# Altium PCB finalpcbmaybe.PcbDoc
Units mm, origin at the board's own origin, x right, y up, seen from the top; angles counter-clockwise.
Board outline 149 x 69.13 mm, 2 copper layers (Top Layer, Bottom Layer); 110 components, 42 nets, 234 pads, 45 vias.
Unrouted connection lines stored in the file: 1.
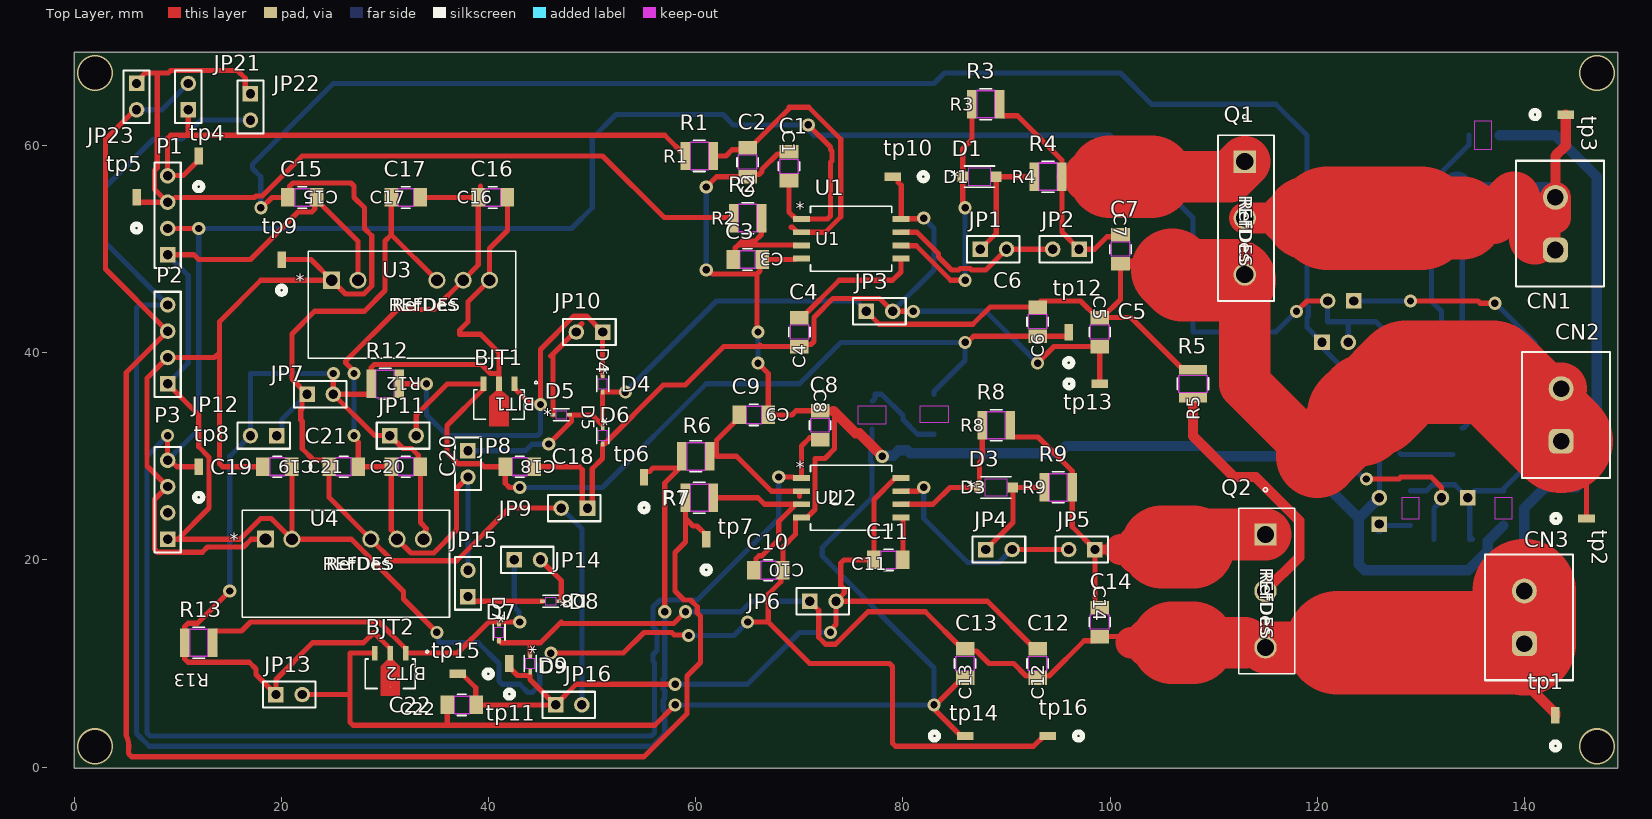
[diagram p0: Top Layer view]
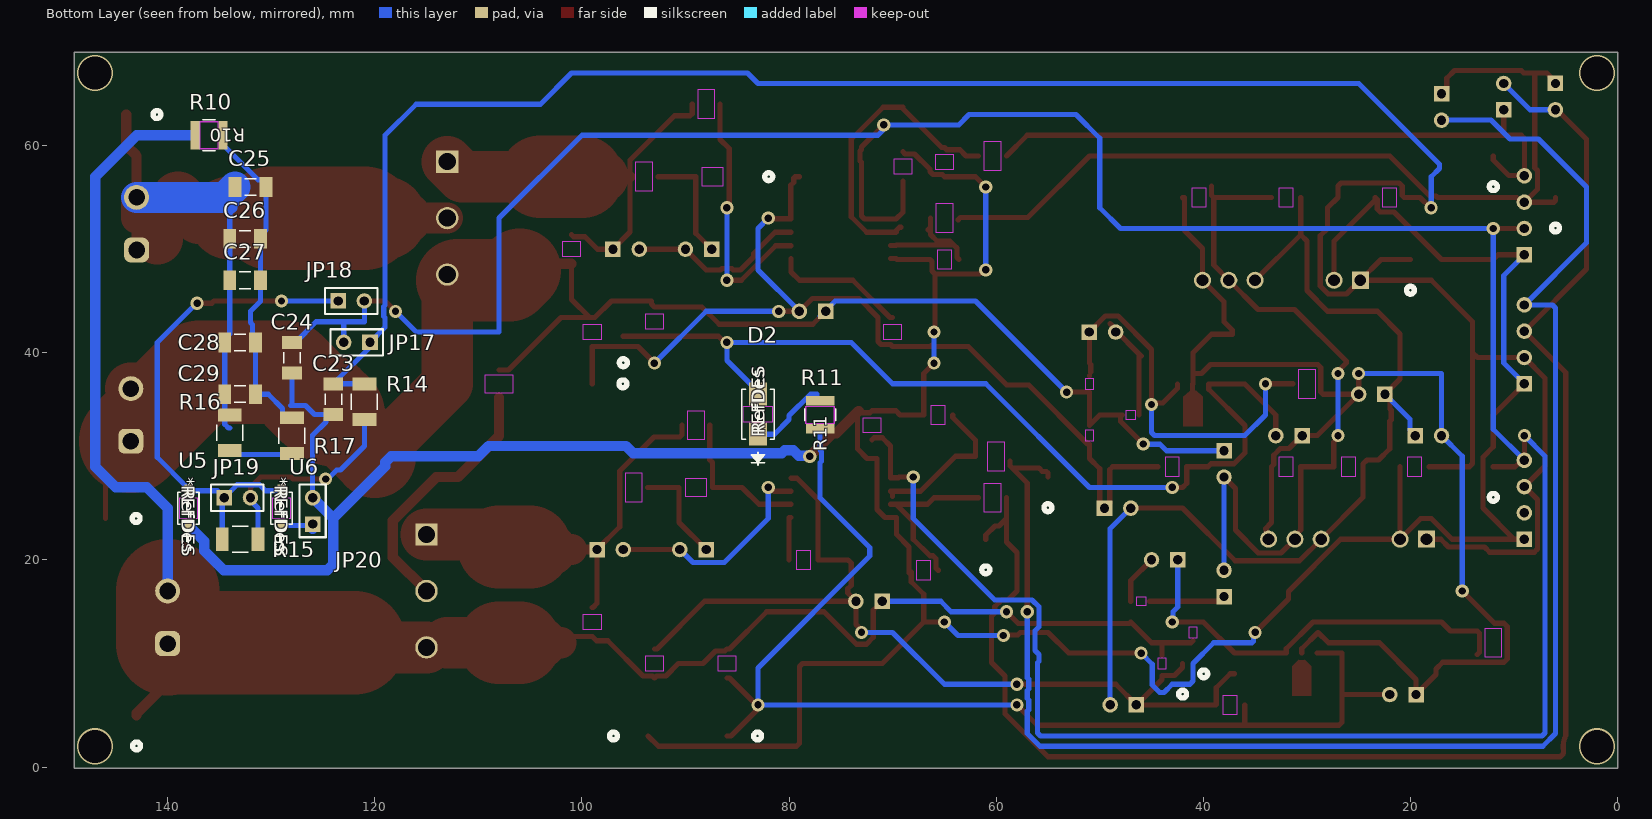
[diagram p1: Bottom Layer view, seen from below]
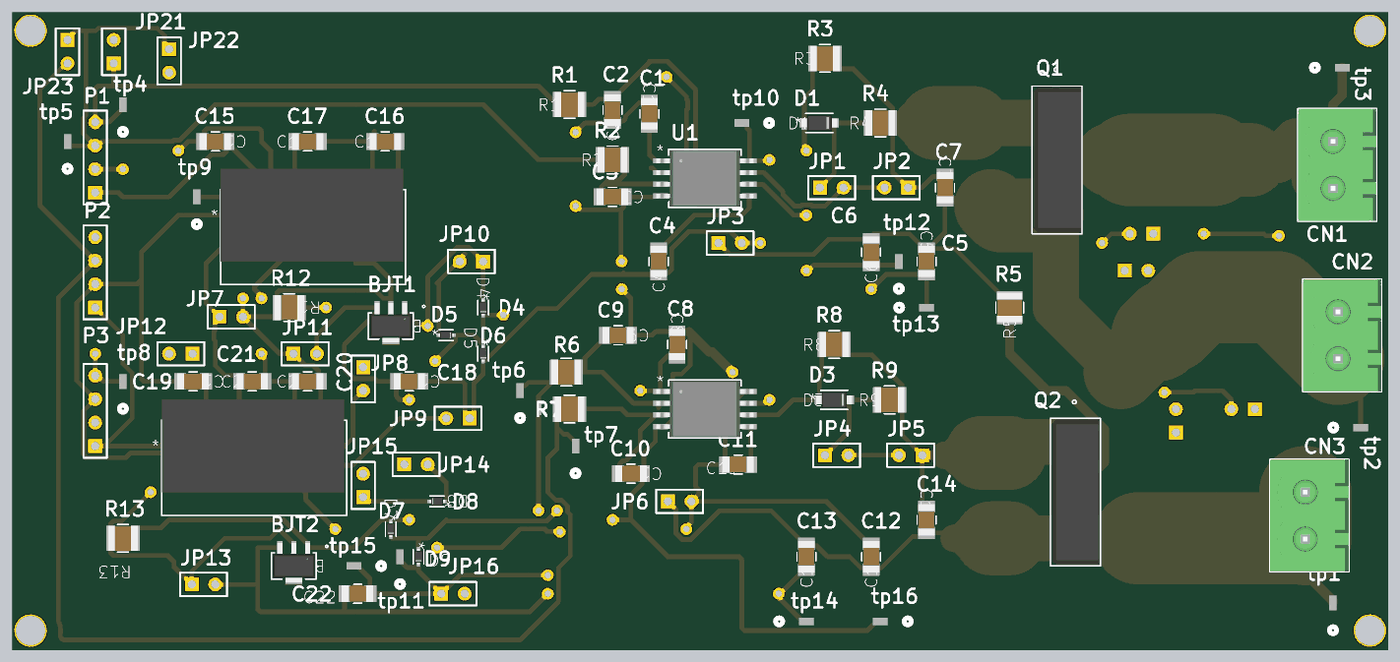
[diagram p2: 3D render of the assembled board from above, using the file's embedded part models]
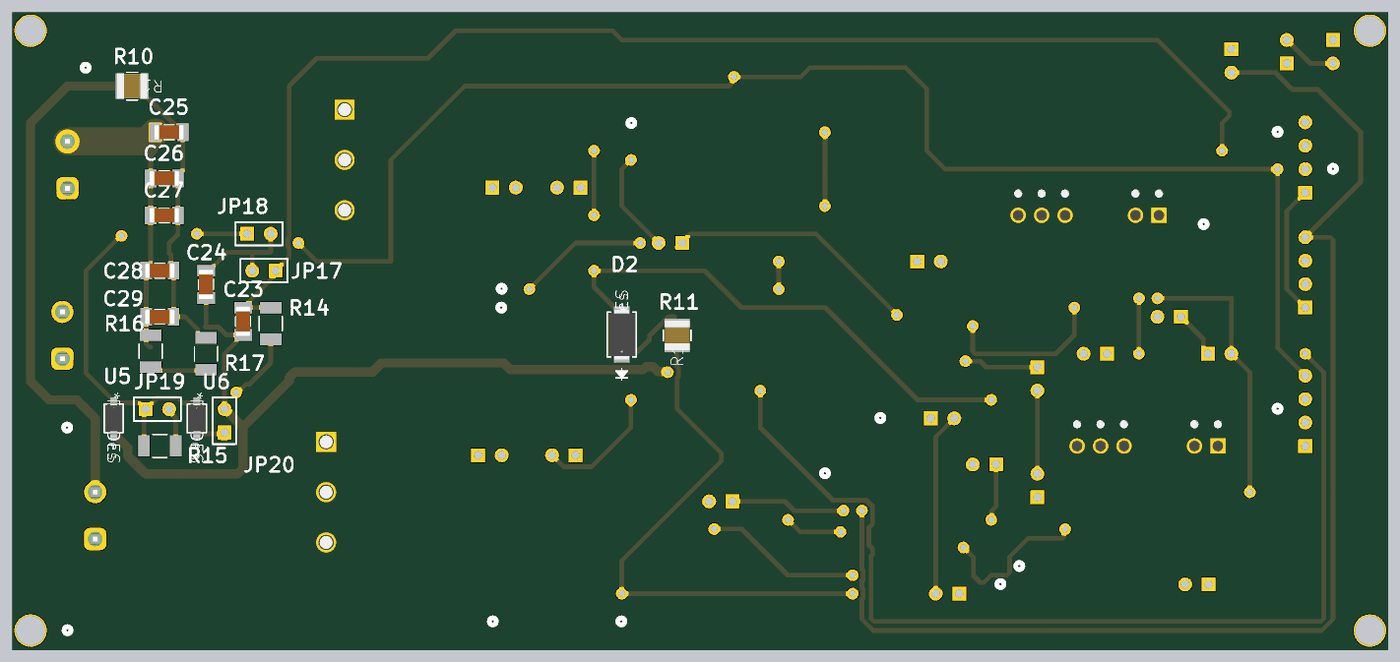
[diagram p3: 3D render of the assembled board from below, using the file's embedded part models]

## Layer stack, top to bottom
Top Solder: solder mask 0.0102, Solder Resist, Dk 3.5
Top Layer: signal copper 0.07
Dielectric 1: dielectric 0.32, FR-4, Dk 4.8
Bottom Layer: signal copper 0.07
Bottom Solder: solder mask 0.0102, Solder Resist, Dk 3.5

## Board outline
0,-0.127 149,-0.127 149,69 0,69

## Design rules (kind name [scope] priority, off if disabled: settings)
Clearance [All] p1: gap=0.254 ignorepadtopadclearanceinfootprint=FALSE
PolygonConnect [All] p1: connectstyle=Relief reliefconductorwidth=0.254 reliefentries=4 polygonreliefangle="90 Angle" airgapwidth=0.254
RoutingVias [All] p1: holewidth=0.711 width=1.27 viastyle="Through Hole" minholewidth=0.711 minwidth=1.27 maxholewidth=0.711 maxwidth=1.27
SolderMaskExpansion [All] p1: expansion=0.102 istentingtop=FALSE
SupplyNets "Schematic Supply Nets_1" [InNet('GND')] p1: voltage=0.000
Width [All] p1: maxlimit=10 minlimit=0.5 preferedwidth=10 bottomlayer_prefwidth=0.5 minimp=50.000000 maximp=50.000000 favimp=50.000000
30 further rules are at their usual default settings.

## Components (designator, comment, footprint, x,y, rotation, side; value= is the part's Value field where it differs from the comment)
BJT1 "2STF1360" SOT-89_STM 41,35 r180 top
BJT2 "2STF1360" SOT-89_STM 30.495,9.006 r180 top
C1 "100nF" CAPC340180_88N_KEM 69,58 r270 top
C2 "220pF" CAPC340180_88N_KEM 65,58.403 r90 top
C3 "220pF" CAPC340180_88N_KEM 65,49 r180 top
C4 "100nF" CAPC340180_88N_KEM 70,42 r90 top
C5 "1uF" CAPC340180_88N_KEM 99,42 r270 top
C6 "1uF" CAPC340180_88N_KEM 93,43 r90 top
C7 "N.M" CAPC340180_88N_KEM 101,50 r270 top
C8 "100nF" CAPC340180_88N_KEM 72,33 r270 top
C9 "220pF" CAPC340180_88N_KEM 65.597,34 r180 top
C10 "220pF" CAPC340180_88N_KEM 67,19 r180 top
C11 "100nF" CAPC340180_88N_KEM 78.597,20 r0 top
C12 "1uF" CAPC340180_88N_KEM 93,10 r90 top
C13 "1uF" CAPC340180_88N_KEM 86,10 r90 top
C14 "N.M" CAPC340180_88N_KEM 99,14 r270 top
C15 "NM" CAPC340180_88N_KEM 22,55 r180 top
C16 "1u" CAPC340180_88N_KEM 40.403,55 r0 top
C17 "1u" CAPC340180_88N_KEM 32,55 r0 top
C18 "4.7u" CAPC340180_88N_KEM 43,29 r180 top
C19 "NM" CAPC340180_88N_KEM 19.597,29 r180 top
C20 "1u" CAPC340180_88N_KEM 32,29 r0 top
C21 "1u" CAPC340180_88N_KEM 26,29 r0 top
C22 "4.7u" CAPC340180_88N_KEM 37.403,6 r180 top
C23 "10u" CAPC3216X178 124,35.515 r90 bottom
C24 "4.7U" CAPC3216X178 128,39.515 r90 bottom
C25 "NM" CAPC3216X178 132,56 r0 bottom
C26 "NM" CAPC3216X178 132.515,51 r0 bottom
C27 "NM" CAPC3216X178 132.515,47 r0 bottom
C28 "NM" CAPC3216X178 133,41 r0 bottom
C29 "33nF" CAPC3216X178 133,36 r0 bottom
CN1 "691311500102" 691311500102 143.45,52.46 r90 top
CN2 "691311500102" 691311500102 144,34 r90 top
CN3 "691311500102" 691311500102 140.45,14.46 r90 top
D1 "STPS2L40ZFY" CR_2L40ZFY_STM 87.389,57 r0 top
D2 "STTH112A" SMA_STM 83,34.07 r90 bottom
D3 "STPS2L40ZFY" CR_2L40ZFY_STM 89,27 r0 top
D4 "BZT585B2V7T-7" SOD523_DIO 51,37 r270 top
D5 "BZT585B2V7T-7" SOD523_DIO 47,34 r0 top
D6 "BZT585B2V7T-7" SOD523_DIO 51,32 r270 top
D7 "BZT585B2V7T-7" SOD523_DIO 41,13 r270 top
D8 "BZT585B2V7T-7" SOD523_DIO 46,16 r180 top
D9 "BZT585B2V7T-7" SOD523_DIO 44,10 r270 top
JP1 "Header 2" HDR1X2 87.46,50 r0 top
JP2 "Header 2" HDR1X2 97,50 r180 top
JP3 "Header 3" HDR1X2 76.46,44 r0 top
JP4 "Header 3" HDR1X2 88,21 r0 top
JP5 "Header 3" HDR1X2 98.54,21 r180 top
JP6 "Header 3" HDR1X2 71,16 r0 top
JP7 "Header 3" HDR1X2 22.46,36 r0 top
JP8 "Header 3" HDR1X2 38,30.54 r270 top
JP9 "Header 3" HDR1X2 49.54,25 r180 top
JP10 "Header 3" HDR1X2 51,42 r180 top
JP11 "Header 3" HDR1X2 30.46,32 r0 top
JP12 "Header 3" HDR1X2 19.54,32 r180 top
JP13 "Header 3" HDR1X2 19.46,7 r0 top
JP14 "Header 3" HDR1X2 42.46,20 r0 top
JP15 "Header 3" HDR1X2 38,16.46 r90 top
JP16 "Header 3" HDR1X2 46.46,6 r0 top
JP17 "Header 3" HDR1X2 120.46,41 r0 bottom
JP18 "Header 3" HDR1X2 123.54,45 r180 bottom
JP19 "Header 3" HDR1X2 134.54,26 r180 bottom
JP20 "Header 3" HDR1X2 126,23.46 r90 bottom
JP21 "Header 3" HDR1X2 11,63.46 r90 top
JP22 "Header 3" HDR1X2 17,65 r270 top
JP23 "Header 3" HDR1X2 6,66 r270 top
P1 "Header 4" HDR1X4 9,49.46 r90 top
P2 "Header 4" HDR1X4 9,37 r90 top
P3 "Header 4" HDR1X4 9,22 r90 top
Q1 "SCT040W120G3AG" QNMOS1G2D3S_HiP247_15p6x5p0-5p45_STM 113,58.45 r270 top
Q2 "SCT040W120G3AG" QNMOS1G2D3S_HiP247_15p6x5p0-5p45_STM 115,22.45 r270 top
R1 "100" RES_RC1210_3P1X2P6_YAG 60.346,59 r0 top
R2 "100" RES_RC1210_3P1X2P6_YAG 65,53 r0 top
R3 "39" RES_RC1210_3P1X2P6_YAG 88,64 r0 top
R4 "3.3" RES_RC1210_3P1X2P6_YAG 94,57 r0 top
R5 "NM" RES_RC1210_3P1X2P6_YAG 108,37 r90 top
R6 "100" RES_RC1210_3P1X2P6_YAG 60,30 r0 top
R7 "100" RES_RC1210_3P1X2P6_YAG 60.346,26 r0 top
R8 "39" RES_RC1210_3P1X2P6_YAG 89,33 r0 top
R9 "3.3" RES_RC1210_3P1X2P6_YAG 95,27 r0 top
R10 "NM" RES_RC1210_3P1X2P6_YAG 136,61 r0 bottom
R11 "10-20R" RES_RC1210_3P1X2P6_YAG 77,34 r90 bottom
R12 "1k" RES_RC1210_3P1X2P6_YAG 30,37 r180 top
R13 "1k" RES_RC1210_3P1X2P6_YAG 12,12 r180 top
R14 "240" RES_ERJ14BQF2R2U 121,35.275 r90 bottom
R15 "100" RES_ERJ14BQF2R2U 133,22 r180 bottom
R16 "NM" RES_ERJ14BQF2R2U 134,32.275 r90 bottom
R17 "NM" RES_ERJ14BQF2R2U 128,32 r270 bottom
tp1 "RCU-0C" CONN1_RCU-0C_TEC 143,5 r90 top
tp2 "RCU-0C" CONN1_RCU-0C_TEC 146,24 r0 top
tp3 "RCU-0C" CONN1_RCU-0C_TEC 144,63 r0 top
tp4 "RCU-0C" CONN1_RCU-0C_TEC 12,59 r90 top
tp5 "RCU-0C" CONN1_RCU-0C_TEC 6,55 r90 top
tp6 "RCU-0C" CONN1_RCU-0C_TEC 55,28 r90 top
tp7 "RCU-0C" CONN1_RCU-0C_TEC 61,22 r90 top
tp8 "RCU-0C" CONN1_RCU-0C_TEC 12,29 r90 top
tp9 "RCU-0C" CONN1_RCU-0C_TEC 20,49 r90 top
tp10 "RCU-0C" CONN1_RCU-0C_TEC 79,57 r180 top
tp11 "RCU-0C" CONN1_RCU-0C_TEC 42,10 r90 top
tp12 "RCU-0C" CONN1_RCU-0C_TEC 96,42 r90 top
tp13 "RCU-0C" CONN1_RCU-0C_TEC 99,37 r0 top
tp14 "RCU-0C" CONN1_RCU-0C_TEC 86,3 r0 top
tp15 "RCU-0C" CONN1_RCU-0C_TEC 37,9 r180 top
tp16 "RCU-0C" CONN1_RCU-0C_TEC 94,3 r180 top
U1 "STGAP2SICSCTR" SO8_7P59X6P05_STM 75,51 r0 top
U2 "STGAP2SICSCTR" SO8_7P59X6P05_STM 75,26 r0 top
U3 "MGJ2D051505SC" MGJ2_MUR 24.84,47 r0 top
U4 "MGJ2D051505SC" MGJ2_MUR 18.46,22 r0 top
U5 "MMSZ5V1T1G" SOD-123_ONS 138,25 r270 bottom
U6 "MMSZ3V3T1G" SOD-123_ONS 129,25 r270 bottom

## Footprints (in the part's own frame and the unit in brackets; to place one, negate y for a bottom-side part, rotate by r counter-clockwise, add the part's x,y. Pads: shape width x height; smd on the part's side, far side on the other; paste and mask are expansions set on the pad)
691311500102 [mm] "5,08mm - PCB Headers - Vertical - Closed ends -02p"
  rrect50% 2.4x2.4 hole 1.6: 1(-2.54,0.45)
  round 2.4 hole 1.6: 2(2.54,0.45)
  silkscreen extent -6.08,-4.25 6.08,4.25, body extent -6.08,-4.25 6.08,4.25, height 12.05
CAPC3216X178 [mm]
  rect 1.24x1.91 smd: 1(-1.485,0) 2(1.485,0)
  silkscreen extent -0.55,-0.8 0.55,0.8, body extent -1.6,-0.8 1.6,0.8, height 1.8
CAPC340180_88N_KEM [mm]
  rect 1.306x1.8 smd paste+0 mask+0: 1(-1.403,0) 2(1.403,0)
  Top Layer keep-out region: -0.699,-0.849 -0.699,0.849 0.699,0.849 0.699,-0.849
  Keep-Out Layer region: -0.699,-0.9 -0.699,0.9 0.699,0.9 0.699,-0.9
  silkscreen extent -0.44,-1.03 0.44,1.03, body extent -1.7,-0.9 1.7,0.9, height 0.88
CONN1_RCU-0C_TEC [mil]
  rect 63x32 smd paste+0 mask+0: 1(0,0)
  silkscreen extent -131,-15 -102,15
CR_2L40ZFY_STM [mil]
  rect 40.87x39 smd paste+0 mask+0: 1(-63.44,0) 2(63.44,0)
  Top Layer keep-out region: -41,-33.5 -41,33.5 41,33.5 41,-33.5
  Keep-Out Layer region: -41,-33.5 -41,33.5 41,33.5 41,-33.5
  silkscreen extent -58,-40 58,40, body extent -76,-36 76,36, height 43
HDR1X2 [mm] "Connector; Header; 2 Position"
  rect 1.5x1.5 hole 0.9: 1(0,0)
  round 1.5 hole 0.9: 2(2.54,0)
  silkscreen extent -1.27,-1.27 3.81,1.27
HDR1X4 [mm] "Connector; Header; 4 Position"
  rect 1.5x1.5 hole 0.9: 1(0,0)
  round 1.5 hole 0.9: 2(2.54,0) 3(5.08,0) 4(7.62,0)
  silkscreen extent -1.27,-1.27 8.89,1.27
MGJ2_MUR [mil]
  rect 65x65 / inner round 60 / far side rect 65x65 hole 45 paste-99999 mask+0: 1(0,0)
  round 65 / inner round 60 / far side round 65 hole 45 paste-99999 mask+0: 2(100,0) 5(400,0) 6(500,0) 7(600,0)
  silkscreen extent -89,-296 699,110, body extent -89,-198 689,198, height 502
QNMOS1G2D3S_HiP247_15p6x5p0-5p45_STM [mil]
  rect 85x85 / inner round 60 / far side rect 85x85 hole 65 paste-99999 mask+0: 1(0,0)
  round 85 / inner round 60 / far side round 85 hole 65 paste-99999 mask+0: 2(214.57,0) 3(429.13,0)
  silkscreen extent -178,-102 530,111, body extent -95,-97 525,106, height 963
RES_ERJ14BQF2R2U [mm]
  rect 1.25x2.3 smd: 1(-1.725,0) 2(1.725,0)
  silkscreen extent -0.78,-1.25 0.78,1.25
RES_RC1210_3P1X2P6_YAG [mil]
  rect 36x108 smd paste+0 mask+0: 1(-53,0) 2(53,0)
  Top Layer keep-out region: -33,-52 -33,52 33,52 33,-52
  Keep-Out Layer region: -33,-54 -33,54 33,54 33,-54
  silkscreen extent -23,-59 23,59, body extent -63,-54 63,54, height 26
SMA_STM [mil]
  rect 87x67 smd paste+0 mask+0: 1(-76,0) 2(76,0)
  Top Layer keep-out region: -30.5,-55 -30.5,55 30.5,55 30.5,-55
  Keep-Out Layer region: -30.5,-55 -30.5,55 30.5,55 30.5,-55
  silkscreen extent -194,-62 96,62, body extent -106,-57 106,57, height 104
SO8_7P59X6P05_STM [mil]
  rect 64x22 smd paste+0 mask+0: 1(-189,75) 2(-189,25) 3(-189,-25) 4(-189,-75) 5(189,-75) 6(189,-25) 7(189,25) 8(189,75)
  silkscreen extent -154,-124 154,124, body extent -207,-119 207,119, height 104
SOD523_DIO [mm]
  rect 0.503x0.35 smd paste+0 mask+0: 1(-0.802,0) 2(0.802,0)
  Top Layer keep-out region: -0.499,-0.399 -0.499,0.399 0.499,0.399 0.499,-0.399
  Keep-Out Layer region: -0.499,-0.399 -0.499,0.399 0.499,0.399 0.499,-0.399
  silkscreen extent -0.78,-0.58 0.78,0.58, body extent -0.85,-0.45 0.85,0.45, height 0.82
SOD-123_ONS [mil]
  rect 48x30 smd paste+0 mask+0: 1(-66,0) 2(66,0)
  Keep-Out Layer region: -40,-33.5 -40,33.5 40,33.5 40,-33.5
  silkscreen extent -61,-41 61,41, body extent -76,-36 76,36, height 53
SOT-89_STM [mil]
  rect 22x55 smd paste+0 mask+0: 1(-58.86,-78.5) 2(0,-78.5) 3(58.86,-78.5)
  rect 2x2 smd paste-1 mask-1: 4(0,50)
  Top Layer region: 11,-51 -11,-51 -11,-53 -37,-29 -37,83 37,83 37,-29 11,-54
  silkscreen extent -146,-88 96,56, body extent -91,-98 91,69, height 65

## Part data
BJT1 BJT2: "Low voltage fast-switching NPN power transistor", Manufacturer_Name=STMicroelectronics, Copyright="Copyright (C) 2025 Ultra Librarian. All rights reserved.", Manufacturer_Part_Number=2STF1360, RefDes=RefDes, Type=Type
C1 C2 C3 C4 C5 C6 C7 C8 C9 C10 C11 C12 C13 C14 C15 C16 C17 C18 C19 C20 C21 C22: library part C1206C100J5GACTU, "SMD Comm C0G, Ceramic, 10 pF, 5%, 50 VDC, C0G, SMD, MLCC, Ultra-Stable, Low Loss, Class I, 1206", Manufacturer_Name=Kemet, Copyright="Copyright (C) 2025 Ultra Librarian. All rights reserved.", Manufacturer_Part_Number=C1206C100J5GACTU
C23 C24 C25 C26 C27 C28 C29: library part 12063C105KAT2A, "1 ÂµF Â±10% 25V Ceramic Capacitor X7R 1206 (3216 Metric)", Package="1206-2 KEMET", Check_prices=https://www.snapeda.com/parts/12063C105KAT2A/Kyocera/view-part/?ref=eda, MF="KYOCERA AVX Components Corporation", MP=12063C105KAT2A, SnapEDA_Link=https://www.snapeda.com/parts/12063C105KAT2A/Kyocera/view-part/?ref=snap
CN1 CN2 CN3: "WR-TBL Series 311 Close Vertical PCB Header, THT, pitch 5.08mm, 02p", Manufacturer="Wurth Elektronik", Max Operating Temperature=105°C, Min Operating Temperature=-40°C, Rated Current=20A, Working Voltage=300V, Application=Pluggable, Category="Terminal Block", ComponentLink1Description="Website Link", ComponentLink1URL=https://www.we-online.com/redexpert/article/691311500102?ad, ComponentLink2Description="Datasheet Link", ComponentLink2URL=https://www.we-online.com/redexpert/spec/691311500102?ad, Manufacturer Part Number=691311500102, Match Code=WR-TBL, Modularity=No, Mount="Through Hole", Number of Pins=2, Number of Rows=1, Orientation=Vertical, Packaging=Box, Pitch=5.08mm, System="Pluggable Connector"
D1 D3: "Automotive 40 V, 2 A Low Drop Power Schottky Rectifier", Manufacturer_Name=STMicroelectronics, Copyright="Copyright (C) 2026 Ultra Librarian. All rights reserved.", Manufacturer_Part_Number=STPS2L40ZFY
D2: "1200 V, 1A Ultrafast Diode", Manufacturer_Name=STMicroelectronics, Copyright="Copyright (C) 2025 Ultra Librarian. All rights reserved.", Manufacturer_Part_Number=STTH112A
D4 D5 D6 D7 D8 D9: "Description", Manufacturer_Name="Diodes Inc", Copyright="Copyright (C) 2025 Ultra Librarian. All rights reserved.", Manufacturer_Part_Number=BZT585B2V7T-7
JP1 JP2: "Header, 2-Pin", LatestRevisionDate=17-Jul-2002, LatestRevisionNote="Re-released for DXP Platform.", Publisher="Altium Limited"
JP3 JP4 JP5 JP6 JP7 JP8 JP9 JP10 JP11 JP12 JP13 JP14 JP15 JP16 JP17 JP18 JP19 JP20 JP21 JP22 JP23: library part "Header 2", "Header, 2-Pin", LatestRevisionDate=17-Jul-2002, LatestRevisionNote="Re-released for DXP Platform.", Publisher="Altium Limited"
P1 P2 P3: "Header, 4-Pin", LatestRevisionDate=17-Jul-2002, LatestRevisionNote="Re-released for DXP Platform.", Publisher="Altium Limited"
Q1 Q2: "Automotive-grade silicon carbide Power MOSFET 1200 V, 40 mOhm typ., 40 A in an HiP247 package", Manufacturer_Name=STMicroelectronics, Copyright="Copyright (C) 2025 Ultra Librarian. All rights reserved.", Manufacturer_Part_Number=SCT040W120G3AG, Type=Transistors
R1 R2 R3 R4 R5 R6 R7 R8 R9 R10 R11 R12 R13: library part RC1210FR-071RL, "No Description Available", Manufacturer_Name=Yageo, Copyright="Copyright (C) 2026 Ultra Librarian. All rights reserved.", Manufacturer_Part_Number=RC1210FR-071RL
R14 R15 R16 R17: library part ERJ14BQF2R2U, Package=None, Availability=Unavailable, MP=ERJ14BQF2R2U, Price=None
tp1 tp2 tp3 tp4 tp5 tp6 tp7 tp8 tp9 tp10 tp11 tp12 tp13 tp14 tp15 tp16: "0603 PROBE PAD", Manufacturer_Name="TE Connectivity", Copyright="Copyright (C) 2025 Ultra Librarian. All rights reserved.", Manufacturer_Part_Number=RCU-0C, RefDes=RefDes, Type=Type
U1 U2: "Galvanically isolated 4 A single gate driver for SiC MOSFETs", Manufacturer_Name=STMicroelectronics, Copyright="Copyright (C) 2026 Ultra Librarian. All rights reserved.", Manufacturer_Part_Number=STGAP2SICSCTR, RefDes=RefDes, Type=Type
U3 U4: "Description", Manufacturer_Name=Murata, Copyright="Copyright (C) 2025 Ultra Librarian. All rights reserved.", Manufacturer_Part_Number=MGJ2D051505SC, RefDes=RefDes, Type=Type
U5 U6: "Description", Manufacturer_Name=onsemi, Copyright="Copyright (C) 2025 Ultra Librarian. All rights reserved.", RefDes=RefDes, Type=Type
  U5: Manufacturer_Part_Number=MMSZ5V1T1G
  U6: Manufacturer_Part_Number=MMSZ3V3T1G

## Via types
v1: diameter 1.27, hole 0.711, Top Layer to Bottom Layer, 41 vias
v2: diameter 3.5, hole 3.2, Top Layer to Bottom Layer, 4 vias

## Nets (pads, with @x,y where several pads share a name; then routed paths per layer and width w, separated by ;. In a path a pad name is that pad's centre, name@x,y a point inside that pad or via, vN(x,y) a via of type N, cw(c..) or ccw(c..) an arc to the next point about the centre after c; other vN are vias at no path point)
0V: C16.1 C17.2 C20.1 C21.2 JP8.2 JP15.2 U3.6 U4.6 | length 72.9
  Top Layer w0.5: v1(27,32) 27,31.792 27.403,31.389 C21.2 C20.1 30.597,22.874 31.16,22.311 U4.6 32.49,20.671 34.688,20.671 36.904,22.887 36.904,26.904 JP8.2 ; v1(27,38) 27,38.208 26.207,39.001 26.207,39.207 31.182,44.182 34.722,44.182 U3.6 39,48.46 C16.1 ; C17.2 C16.1 ; 39.2,56.109 39.2,55.2 C16.1
  Bottom Layer w0.5: v1(27,32) v1(27,38) ; JP15.2 JP8.2
+VOUT: BJT1.2 BJT2.2 C16.2 C20.2 JP7.2 JP11.1 JP12.2 JP13.1 R12.2 R13.2 U3.7 U4.7 | length 128.5
  Top Layer w0.5: v1(15,17) 11.876,13.876 10.953,13.876 10.658,13.58 10.658,12.004 R13.2 10.658,11.996 10.658,10.42 10.953,10.124 16.876,10.124 17.523,9.477 17.523,8.937 JP13.1 19.46,8.46 23,12 27.914,12 28.914,13 30.495,11.419 BJT2.2 ; v1(25,38) JP7.2 ; R12.2@28.654,37.793 R12.2 28.654,36.207 28.447,36 JP7.2 ; R12.2@28.658,38 28.658,38.58 28.953,38.876 39.314,38.876 40.19,38 41,38 ; U4.7 33.92,22.22 33.92,22.92 34,23 33.403,23.597 C20.2 33.203,29.2 33.203,30.109 32.566,30.746 31.714,30.746 JP11.1 29,32 JP7.2 ; 41.125,36.171 41.029,36.266 41.029,36.965 BJT1.2 41,38 ; C16.2 42,55 41.806,54.806 41.806,51.793 40.08,50.068 U3.7 38,44.92 38,43 37.207,42.207 37.207,41.793 39.207,41.793 41,40 41,38
  Bottom Layer w0.5: v1(15,17) 15,30 JP12.2 17,38 v1(25,38)
-VOUT: C17.1 C21.1 JP7.1 JP9.2 JP12.1 JP16.2 U3.5 U4.5 | length 96.7
  Top Layer w0.5: JP7.1@22,36 21.96,35.96 21.96,34.571 21.861,34.472 21.861,33.528 22,33.389 22,30.73 23.08,29.65 24.194,29.65 24.597,29.247 C21.1 24.597,26.023 U4.5 30.703,19.917 36.917,19.917 42,25 JP9.2 ; JP7.1 21,37.46 21,41.806 23.194,44 28,44 30,46 30,50.806 30.597,51.403 ; C17.1 30.597,51.403 ; U3.5 30.597,51.403
  Bottom Layer w0.5: JP12.1 JP12.1@20,32 ; JP12.1@19.77,32.23 20.04,32.5 20.04,33.58 JP7.1 ; JP9.2 49,23 JP16.2
"C_IN +H": JP21.1 P1.4 R1.1 tp4.1 | length 60.8
  Top Layer w0.5: P1.4 9.026,57.106 10.5,57.106 12,58.606 tp4.1 ; P1.4@9,57.349 9,60.707 9.293,61 11,61 ; JP21.1 11,61 ; R1.1 57,61 11,61
"C_IN +L": JP22.2 P2.4 R6.1 tp6.1 | length 158.1
  Top Layer w0.5: tp6.1 55,28.394 55.156,28.55 55.55,28.55 55.878,28.878 R6.1@58.447,28.878 ; v1(57,15) 57,27.432 R6.1@58.447,28.878 ; R6.1@58.654,29.543 58.654,29.086 R6.1@58.447,28.878
  Bottom Layer w0.5: JP22.2 12.213,62.46 10.387,60.634 7.634,60.634 3,56 3,50.62 P2.4 6.293,44.62 6,44.327 6,3.227 7.227,2 55.773,2 57,3.227 57,5.389 56.861,5.528 56.861,6.472 57,6.611 57,7.389 56.861,7.528 56.861,8.472 57,8.611 v1(57,15)
"C_IN -H": JP22.1 JP23.1 P1.3 R2.1 tp5.1 | length 87.8
  Top Layer w0.5: tp5.1 6,54.696 6.156,54.54 P1.3 ; JP23.1@6.381,66.54 6.841,67 8,67 ; 9,67 8,67 ; 9.093,67.04 9.307,67.254 15.746,67.254 16.5,66.5 16.5,65.5 JP22.1 ; R2.1@63.658,52.834 63.447,53.046 56.954,53.046 51,59 22,59 18.139,55.139 17.528,55.139 17.389,55 9.731,55 9.271,54.54 P1.3 ; 8,67 8,57.853 7.746,57.599 7.746,55.794 P1.3
"C_IN -L": JP21.2 JP23.2 P2.3 R7.1 tp7.1 | length 155.7
  Top Layer w0.5: JP23.2 5.841,63.46 3,60.619 3,48.08 P2.3 5,38.08 5,3.039 cw(c3,2) 5.216,1.589 ccw(c5.708,1.5) 5.416,1.094 5.547,1 5.708,1 55,1 59.139,5.139 59.139,8.793 60.444,10.098 60.444,14.556 60.139,14.861 60.139,15.472 59.472,16.139 58.861,16.139 58,17 58,20.716 59,21.716 59,24 ; R7.1 59,24 ; tp7.1 61,22.394 60.119,23.275 59.725,23.275 59,24
  Bottom Layer w0.5: JP23.2 8.46,63.46 JP21.2
GND: C1.1 C2.1 C3.1 C8.1 C9.1 C10.1 C15.1 C19.1 C23.1 C24.1 JP20.2 P1.1 P2.1 P3.1 tp16.1 U1.4 U2.4 U3.2 U4.2 U5.2 | length 343.1
  Top Layer w0.5: P3.1 10,22 ; P2.1 12,34 12,30.919 13,29.919 13,25 10,22 ; P1.1 11.54,49.46 12,49 17,49 21.596,53.596 22.908,53.596 23.203,53.891 C15.1@23.203,54.8 ; C19.1 U4.2 ; C15.1 23.403,54.753 27.38,50.776 U3.2 ; v1(35,13) 31.78,16.22 31.78,16.96 26.74,22 U4.2 ; v1(46,11) 53,11 55,13 57.67,13 57.92,12.75 59.25,12.75 v1(59.305,12.695) ; v1(61,48) 61.208,48 61.612,47.596 65.908,47.596 ; v1(61,56) 62,57 C2.1 65.2,57.2 66.109,57.2 66.404,57.495 66.404,57.716 67.891,59.203 68.8,59.203 C1.1 ; v1(65,14) 67,14 ; v1(66,39) 67,38 C9.1 69.275,34 69.678,34.403 C8.1 72.2,34.203 73.109,34.203 ; v1(66,42) 65.908,42.092 65.908,47.596 ; C10.1@68.403,18.753 68.403,21.241 69.637,22.475 69.637,24.066 69.666,24.095 U2.4 70.733,24.095 71.219,24.582 71.221,24.582 71.516,24.877 71.516,29.796 72.464,29.796 73.404,30.736 73.404,33.908 ; C10.1 68.203,18.8 68.203,17.891 67,16.688 67,14 ; U1.4 69.666,49.095 69.571,49 C3.1 66.203,48.8 66.203,47.891 65.908,47.596 ; tp16.1@93.606,3 92.606,2 79.289,2 78.996,2.293 78.996,9.707 78.703,10 71,10 67,14 ; 10,22 16,22 18,24 19,24 U4.2
  Top Layer w1: 73.286,34.38 75.45,32.216 75.784,32.216 v1(78,30)
  Bottom Layer w0.5: P2.1 11,39 11,47.46 P1.1 ; v1(35,13) 35.147,12.853 35.147,12.146 35.293,12 39,12 41,10 41,8.293 41.293,8 43,8 43.793,7.207 44.207,7.207 44.926,7.926 44.926,9.926 v1(46,11) ; v1(59.305,12.695) 63.695,12.695 v1(65,14) ; v1(61,48) v1(61,56) ; v1(66,39) v1(66,42) ; C23.1 C23.1@124.335,34.03 ; JP20.2 126,32.03 124.705,33.325 124.705,33.66 C23.1@124.335,34.03 ; C24.1 128,35 128.104,34.896 126.683,34.896 125.817,34.03 C23.1@124.335,34.03
  Bottom Layer w1: v1(78,30) 78.052,30.052 79.052,30.052 79.586,30.586 80.414,30.586 80.72,30.28 95.059,30.28 95.778,31 109,31 110,30 118.414,30 119,29.414 119,29.026 124,24.026 ; JP20.2 125.974,26 124,24.026 ; U5.2@137.991,23.324 136.467,21.8 136.467,20.9 134.566,19 124.586,19 124,19.586 124,24.026
GNDISO_H: C4.1 C5.2 C18.1 D6.2 JP3.2 JP9.1 tp10.1 tp13.1 U1.8 | length 95.6
  Top Layer w0.5: C18.1 48.747,29 49.04,28.707 49.04,25.5 JP9.1 50,25.46 50,28.802 51,29.802 D6.2 51.186,31.198 56.863,36.876 58.974,36.876 62.695,40.597 66.348,40.597 ; 66.191,40.753 66.348,40.597 ; tp10.1 79.394,57 79.55,56.844 79.55,56.45 79.83,56.17 79.83,52.934 81.934,52.934 v1(82,53) ; v1(81,44) JP3.2 77.746,45.254 73.254,45.254 71.404,43.404 71.404,41.092 71.109,40.797 70.2,40.797 C4.1 66.348,40.597 ; v1(93,39) 94.597,40.597 C5.2 tp13.1
  Bottom Layer w0.5: JP3.2 83,48 83,52 v1(82,53) ; v1(81,44) 88,44 v1(93,39)
GNDISO_L: C11.1 C12.2 C22.1 D9.2 JP6.2 JP16.1 tp11.1 tp15.1 U2.8 | length 89
  Top Layer w0.5: tp15.1 37.394,9 38.744,7.65 38.744,6.062 C22.1 JP16.1 ; tp11.1 42,9.606 42.777,8.829 44,8.829 44,8.46 JP16.1 ; v1(58,8) 48.46,8 JP16.1 ; v1(73,13) 73,13.208 73.54,13.748 JP6.2 ; U2.8 79.771,27.876 79.236,27.876 77.194,25.834 C11.1 74.293,20 74,19.707 74,17.54 74.333,17.207 74.333,16.793 JP6.2 ; C12.2 92.753,11.403 88.156,16 JP6.2
  Bottom Layer w0.5: v1(58,8) 65,8 70,13 v1(73,13)
HS_SK: C5.1 C6.2 C7.2 CN2.1 CN2.2 D4.2 D5.2 D6.1 JP3.1 JP8.1 Q1.3 R5.2 tp2.1 | length 163.9
  Top Layer w0.5: v1(45.805,31.195) 48.003,33.392 D5.2@48.003,34 ; D5.2 D5.2@48.003,34 ; D4.2@51,35.997 51,33.003 50.003,34 D5.2@48.003,34 ; D4.2 v1(53.198,36.198) ; JP3.1 77.714,42.746 86.746,42.746 88.403,44.403 C6.2 93.293,44.696 93.293,45 97.156,45 98.753,43.403 C5.1 C5.1@99.247,43.403 ; C7.2 101,45.156 C5.1@99.247,43.403 ; R5.2 107.086,38.346 102.029,43.403 C5.1@99.247,43.403 ; CN2.1 146,29.01 tp2.1
  Top Layer w1: C7.2 103.403,48.597 104,48
  Top Layer w3: 104,48 105,48
  Top Layer w5: 105,48 106,48 ; Q1.3 113,37 120,30 ; 141,35 142.54,36.54 CN2.2
  Top Layer w8: 106,48 107,47 112,47 ; 120,30 124,34
  Top Layer w10: 124,34 124.996,34.996 125.487,34.996 128.608,38.117 136.893,38.117 CN2.1
  Bottom Layer w0.5: JP8.1 43.54,30.54 44.17,31.17 v1@45.781,31.17 ; v1(53.198,36.198) 62,45 75.54,45 JP3.1@77,43.54
HV: C25.2 C26.2 C27.2 C28.2 C29.2 CN1.1 CN1.2 Q1.2 R16.2 tp3.1 | length 72.7
  Top Layer w1: CN1.2 143,59 144,60 tp3.1
  Top Layer w3: Q1.2 117,53 ; 143,53 CN1.2
  Top Layer w5: 117,53 119,53 ; 134,53 137,53 139,55 ; 141,51 141,53
  Top Layer w8: 119,53 121,53 ; 130,53 134,53
  Top Layer w10: 121,53 130,53
  Bottom Layer w0.5: C25.2 133.485,53.943 134,53.428 C26.2 C27.2@134,47.032 ; 134,32.725 134.11,32.725 134.485,33.1 C29.2 C28.2 ; C27.2 134,41.82 C28.2@134.453,41.367
  Bottom Layer w3: C25.2 134.485,55 CN1.2
LS_SK: C12.1 C13.2 C14.2 CN3.1 CN3.2 D7.2 D8.2 D9.1 JP6.1 JP15.1 Q2.3 R10.2 tp1.1 | length 185.7
  Top Layer w0.5: JP15.1 38.46,16 D8.2 ; D7.2 41.198,12 44,12 ; D9.1 44,12 ; v1(59,15) 57.861,13.861 47.139,13.861 47,14 45,12 44,12 ; JP6.1 71.861,15.139 71.861,12.528 72.528,11.861 73.472,11.861 76.611,15 82.156,15 85.753,11.403 C13.2 86.2,11.203 87.109,11.203 88.312,10 90.688,10 91.891,8.797 92.8,8.797 C12.1 93.2,8.797 94.109,8.797 97.506,12.194 98.597,12.194 C14.2 101.403,12.597 102,12
  Top Layer w1: CN3.1 140,8.207 143,5.206 tp1.1
  Top Layer w3: 102,12 104,12
  Top Layer w5: 104,12 106,12 ; 108,12 113,12 ; Q2.3 121.55,11.55 122,12
  Top Layer w8: 106,12 108,12
  Top Layer w10: 122,12 139.92,12 CN3.1 CN3.2
  Bottom Layer w0.5: v1(59,15) 64.354,15 65.354,16 JP6.1
  Bottom Layer w1: R10.2@137.592,61 143,61 147,57 147,29 145,27 142,27 140,25 CN3.2
NetBJT1_1: BJT1.1 D4.1 JP10.1 R12.1 | length 41.2
  Top Layer w0.5: R12.1 v1(34,37) ; BJT1.1 42.495,36.575 43.922,35.147 44.853,35.147 v1(45,35) 45,40.313 48.251,43.565 49.435,43.565 JP10.1 51,39 50.861,38.861 50.861,38.143 ; D4.1@50.984,37.742 50.984,37.785 D4.1
  Bottom Layer w0.5: v1(34,37) 34,34 36,32 44.707,32 45,32.293 v1(45,35)
NetBJT2_1: BJT2.1 D7.1 JP14.1 R13.1 | length 41.2
  Top Layer w0.5: R13.1@13.553,10.878 13.346,11.086 R13.1 13.346,12.914 13.553,13.122 16.122,13.122 17,14 29.409,14 31.99,11.419 BJT2.1 37,11 40,14 40.5,14 40.503,14.003 41.608,14.003 41.611,14 v1(43,14)
  Bottom Layer w0.5: JP14.1 42.46,15.46 42.92,15 42.92,14.08 v1(43,14)
NetC2_2: C2.2 R1.2 U1.2 | length 28.8
  Top Layer w0.5: R1.2 62.9,59 63.506,59.606 64.8,59.606 C2.2 65.247,59.806 69,63.558 69,63.707 70.904,63.707 74,60.611 74,53.132 72.503,51.635 69.666,51.635 69.637,51.664 69.637,51.829 69.344,52.122 69.178,52.122
NetC3_2: C3.2 R2.2 U1.3 | length 12.3
  Top Layer w0.5: C3.2 63.797,49.2 63.797,50.109 64.092,50.404 ; R2.2 66.346,52.086 66.553,51.878 66.342,51.878 66.342,51.42 65.687,50.764 64.452,50.764 64.092,50.404 ; U1.3 69.666,50.365 69.627,50.404 64.092,50.404
NetC4_2: C4.2 U1.5 | length 12.9
  Top Layer w0.5: C4.2 70.247,43.403 73.844,47 79,47 79.801,47.801 U1.5
NetC7_1: C7.1 JP2.1 Q1.1 R3.2 R4.2 | length 40.9
  Top Layer w0.5: R3.2 89.346,63.086 89.553,62.878 91.044,62.878 95.342,58.58 95.342,57.004 R4.2 95.346,51.654 JP2.1 98.5,50 99.703,51.203 100.8,51.203 C7.1
  Top Layer w1: R4.2 97,57
  Top Layer w3: 97,57 98,57
  Top Layer w5: 98,57 100,57 ; 104,57 111.55,57 Q1.1
  Top Layer w8: 100,57 104,57
NetC9_2: C9.2 R6.2 U2.2 | length 15
  Top Layer w0.5: C9.2 64.194,33.753 62,31.558 62,30 63.927,30 67.292,26.635 U2.2@70,26.635 ; 70,26.148 70,26.606 70.029,26.635 U2.2
NetC10_2: C10.2 R7.2 U2.3 | length 17
  Top Layer w0.5: R7.2 66,26 66.635,25.365 U2.3@69.666,25.365 ; C10.2 65.797,19.2 65.797,20.109 66.092,20.404 66.404,20.404 68,22 68,23.701 69.236,24.937 69.238,24.937 U2.3@69.666,25.365 ; U2.3 U2.3@69.666,25.365
NetC11_2: C11.2 U2.5 | length 4.3
  Top Layer w0.5: U2.5 79.971,24.095 80,24.066 C11.2
NetC14_1: C14.1 JP5.1 Q2.1 R8.2 R9.2 | length 39.7
  Top Layer w0.5: R8.2 90.346,32.086 90.553,31.878 93.044,31.878 96.342,28.58 96.342,27.004 R9.2 96.346,23.194 JP5.1 98.54,15.806 98.943,15.403 C14.1
  Top Layer w1: JP5.1 101,21
  Top Layer w3: 101,21 103,21
  Top Layer w5: 103,21 103.254,21.254 105,21.254 ; 108,21.254 109.196,22.45 Q2.1
  Top Layer w8: 105,21.254 108,21.254
NetD1_1: D1.1 R3.1 U1.6 | length 25
  Top Layer w0.5: U1.6 79.83,50.336 81.28,50.336 84.615,47.001 v1(86,47) ; v1(86,54) 85.777,54.223 D1.1 85.777,59.727 86.654,60.604 R3.1
  Bottom Layer w0.5: v1(86,47) v1(86,54)
NetD1_2: D1.2 JP1.1 R4.1 | length 11.3
  Top Layer w0.5: JP1.1 89,51.54 D1.2 R4.1
NetD2_1: D2.1 R11.2 | length 8.4
  Bottom Layer w0.5: R11.2 77.086,35.346 77.293,35.553 77.293,36 77.923,36 79.99,33.933 79.99,33.549 81.399,32.139 D2.1
NetD3_1: D3.1 R8.1 U2.6 | length 14.4
  Top Layer w0.5: U2.6 82.909,25.365 84.544,27 D3.1 87.389,29.396 87.654,29.661 R8.1
NetD3_2: D3.2 JP4.1 R9.1 | length 10.2
  Top Layer w0.5: JP4.1@87.929,20.929 JP4.1 90.611,23.611 D3.2 R9.1
NetD5_1: D5.1 JP10.2 | length 10.4
  Top Layer w0.5: 46,39.675 46.198,39.874 ; D5.1 46.198,39.874 ; JP10.2 JP10.2@48.46,42.135 ; 49,42.811 48.46,42.271 JP10.2@48.46,42.135 ; 46.198,39.874 JP10.2@48.46,42.135
NetD8_1: D8.1 JP14.2 | length 4.8
  Top Layer w0.5: JP14.2 47.003,17.997 D8.1@47.003,16
NetJP1_2: JP1.2 JP2.2 U1.7 | length 17.3
  Top Layer w0.5: U1.7 81.363,51.635 83.446,49.553 83.446,49.236 84.682,48 85.389,48 85.528,48.139 86.472,48.139 86.611,48 88,48 JP1.2 JP2.2
NetJP4_2: JP4.2 JP5.2 U2.7 | length 21.6
  Top Layer w0.5: U2.7 81.427,26.635 81.792,27 v1(82,27) ; JP4.2 JP5.2
  Bottom Layer w0.5: v1(82,27) 82,24 86.254,19.746 89.286,19.746 JP4.2
NetJP18_1: JP18.1 JP19.1 R15.1 U5.1 U6.1 | length 48.9
  Top Layer w0.5: v1(129,45) 135.519,45 135.742,44.777 v1(137.154,44.777)
  Bottom Layer w0.5: JP18.1 v1(129,45) ; U6.1 130.536,26.676 131.114,27.254 133.286,27.254 JP19.1 135.216,26.676 U5.1 138,26.905 141,29.905 141,41 137.223,44.777 v1(137.154,44.777) ; R15.1 135,22 134.725,22.275 JP19.1@134.725,25.815
NetJP19_2: JP19.2 R14.1 R15.2 | length 20.7
  Top Layer w0.5: v1(124.743,27.814) 127.883,27.814 128.069,28 131,28 132,27 JP19.2
  Bottom Layer w0.5: R14.1 121,31 123.308,28.692 123.662,28.692 124.539,27.814 v1(124.743,27.814) ; R15.2 131.275,25.004 132,25.729 JP19.2
NetJP20_1: JP20.1 U6.2 | length 3.5
  Bottom Layer w0.5: JP20.1 126.136,23.324 U6.2
  Bottom Layer w1: JP20.1@126,23 JP20.1
NetQ2_2: Q2.2 R5.1 | length 25.5
  Top Layer w1: R5.1 108,32 112,28 114.052,28 118.254,23.798 118.254,20.254 Q2.2
NetR16_1: R16.1 R17.2 | length 5.1
  Bottom Layer w0.5: R17.2 128.093,30.182 R16.1@133.093,30.182
PowerGround: C25.1 C26.1 C27.1 C28.1 C29.1 R10.1 R17.1 | length 32.5
  Bottom Layer w0.5: R17.1 128.525,33.725 128.9,34.1 128.9,34.625 130.275,36 C29.1 C28.1 131.795,41.28 131.795,42.705 132,42.91 132,44 131.03,44.97 C27.1 C26.1 131.03,51.335 130.515,51.85 C25.1 130.515,56.335 130.885,56.705 131.273,56.705 134.654,60.086 R10.1
VAUX: C15.2 C19.2 C23.2 JP17.1 P2.2 P3.3 R14.2 tp9.1 U3.1 U4.1 | length 240.7
  Top Layer w0.5: v1(18,54) 18.066,54 19.066,55 C15.2 20.797,55.2 20.797,56.109 21.092,56.404 26.707,56.404 27,56.111 27,55 28,54 28,52 28.71,51.291 28.71,46.449 27.931,45.671 26.17,45.671 U3.1 ; C19.2 14.293,29 14,29.293 14,40 ; U4.1 17.066,22 16.312,21.246 12.836,21.246 12.336,20.746 8.041,20.746 7.746,21.041 7.746,25.826 P3.3 7,29.08 7,37.54 P2.2 13.54,39.54 14,40 ; tp9.1 22.84,49 U3.1 ; 14,40 14,43 18,47 U3.1
  Bottom Layer w0.5: v1(18,54) 18,57 17.207,57.793 17.207,58.207 25,66 83,66 84,67 101,67 104,64 116,64 119,61 119,44.611 119.139,44.472 119.139,43.528 119,43.389 119,42.46 JP17.1 ; JP17.1@120.23,40.77 C23.2 R14.2
VDD: C1.2 C8.2 C24.2 JP17.2 JP18.2 P1.2 P3.4 tp8.1 U1.1 U2.1 | length 313.9
  Top Layer w0.5: v1(9,32) P3.4 9.271,29.62 9.891,29 tp8.1 ; P1.2 v1(12,52) ; v1(68,28) 69.385,28 69.451,27.934 70.17,27.934 U2.1 70.199,30.996 71,31.797 71.8,31.797 C8.2 ; C1.2 69,53.571 69.666,52.905 U1.1 72.707,52.905 73,53.198 73,58.389 73.139,58.528 73.139,59.472 73,59.611 73,59.861 v1(70.861,62) ; v1(118,44) 119,45 JP18.2
  Bottom Layer w0.5: P3.4 12,32.62 v1(12,52) 48,52 50,54 50,60.707 52.293,63 62.612,63 63.612,62 v1(70.861,62) 71.008,61.853 71.008,61.397 71.405,61 100,61 108,53 108,42 116,42 v1(118,44) ; v1(9,32) 7,30 7,3.293 7.293,3 55.707,3 56,3.293 56,10.078 55.861,10.217 55.861,10.861 56.246,11.246 56.246,13.166 55.861,13.551 55.861,15.472 56.528,16.139 60.139,16.139 68,24 v1(68,28) ; JP18.2@121,45.121 JP18.2 121,43 123,43 ; JP17.2@123,41.206 123,43 ; C24.2 127.665,41 125.665,43 123,43
VH_H: BJT1.3 C6.1 C18.2 D2.2 JP11.2 tp12.1 | length 92.5
  Top Layer w0.5: JP11.2 33,34 35.994,36.994 BJT1.3 39.476,36.965 39.476,36.476 35.977,32.977 35.977,30.35 37.041,29.286 39.254,29.286 39.54,29 C18.2 41.597,27.403 42,27 v1(43,27) ; v1(86,41) 86.208,41 86.806,41.597 C6.1 tp12.1@96,41.597
  Bottom Layer w0.5: v1(43,27) 51,27 61,37 70,37 74,41 v1(86,41) 86,39.254 83,36.254 D2.2
VH_L: BJT2.3 C13.1 C22.2 JP13.2 R11.1 tp14.1 | length 114.4
  Top Layer w0.5: JP13.2 26.601,7 ; BJT2.3 26.601,11 26.601,7 ; C22.2 36,4.027 ; v1(58,6) 56.027,4.027 36,4.027 ; v1@83.147,5.853 83.147,5.459 85.606,3 tp14.1 ; v1@83.156,6 85.753,8.597 C13.1 ; 26.601,7 26.601,4.32 26.894,4.027 36,4.027
  Bottom Layer w0.5: v1(58,6) v1(83,6) 83,9.576 72.207,20.369 72.207,21.207 77,26 77,29.389 76.861,29.528 76.861,30.472 77,30.611 R11.1
pads on no net: BJT1.4 BJT2.4 P3.2
copper on no net:
  other v2: 2,2 147,2 2,67 147,67

## Silkscreen, mask and mechanical layers (free items; w line width, h text height)
Mechanical 1:
  lines w0.25: -0.125,-0.127 ccw(c0,-0.127) 0,-0.252 ; -0.125,-0.127 ccw(c0,-0.127) 0,-0.252 ; -0.125,-0.127 -0.125,69 ; -0.125,69 cw(c0,69) 0,69.125 ; -0.125,69 cw(c0,69) 0,69.125 ; 0,-0.252 149,-0.252 ; 0,69.125 149,69.125 ; 149,-0.252 ccw(c149,-0.127) 149.125,-0.127 ; 149,-0.252 ccw(c149,-0.127) 149.125,-0.127 ; 149,69.125 cw(c149,69) 149.125,69 ; 149,69.125 cw(c149,69) 149.125,69 ; 149.125,-0.127 149.125,69 ; 0.125,-0.002 0.125,68.875 148.875,68.875 148.875,-0.002 0.125,-0.002

## Text inside footprints (layer, text, board x,y; h text height)
D1: Mechanical 13 "*" at 85.979,56.365 h1.27; Top Overlay "*" at 84.56,56.365 h1.27
D2: Mechanical 13 "RefDes2" at 82.365,31.847 h1.27 r270; Bottom Overlay "REFDES" at 82.365,31.847 h1.27 r270; Bottom Overlay "RefDes" at 82.365,32.165 h1.27 r270
D3: Mechanical 13 "*" at 87.59,26.365 h1.27; Top Overlay "*" at 86.171,26.365 h1.27
D4: Mechanical 13 "*" at 50.365,37.714 h1.27 r270; Top Overlay "*" at 50.365,38.752 h1.27 r270
D5: Mechanical 13 "*" at 46.286,33.365 h1.27; Top Overlay "*" at 45.248,33.365 h1.27
D6: Mechanical 13 "*" at 50.365,32.714 h1.27 r270; Top Overlay "*" at 50.365,33.752 h1.27 r270
D7: Mechanical 13 "*" at 40.365,13.714 h1.27 r270; Top Overlay "*" at 40.365,14.752 h1.27 r270
D8: Mechanical 13 "*" at 46.714,16.635 h1.27 r180; Top Overlay "*" at 47.752,16.635 h1.27 r180
D9: Mechanical 13 "*" at 43.365,10.714 h1.27 r270; Top Overlay "*" at 43.365,11.752 h1.27 r270
Q1: Mechanical 13 "RefDes2" at 112.487,55.223 h1.27 r270; Top Overlay "RefDes" at 112.487,54.905 h1.27 r270; Top Overlay "REFDES" at 112.487,55.223 h1.27 r270
Q2: Mechanical 13 "RefDes2" at 114.487,19.223 h1.27 r270; Top Overlay "RefDes" at 114.487,18.905 h1.27 r270; Top Overlay "REFDES" at 114.487,19.223 h1.27 r270
U1: Mechanical 13 "*" at 71.266,52.676 h1.27; Top Overlay "*" at 69.628,53.337 h1.27
U2: Mechanical 13 "*" at 71.266,27.676 h1.27; Top Overlay "*" at 69.628,28.337 h1.27
U3: Mechanical 13 "RefDes2" at 30.365,44.003 h1.27; Mechanical 13 "*" at 22.643,46.365 h1.27; Top Overlay "REFDES" at 30.365,44.003 h1.27; Top Overlay "RefDes" at 30.682,44.003 h1.27; Top Overlay "*" at 21.373,46.365 h1.27
U4: Mechanical 13 "RefDes2" at 23.985,19.003 h1.27; Mechanical 13 "*" at 16.263,21.365 h1.27; Top Overlay "REFDES" at 23.985,19.003 h1.27; Top Overlay "RefDes" at 24.302,19.003 h1.27; Top Overlay "*" at 14.993,21.365 h1.27
U5: Mechanical 13 "*" at 138.635,26.486 h1.27 r90; Mechanical 13 "RefDes2" at 138.635,27.223 h1.27 r90; Bottom Overlay "REFDES" at 138.635,27.223 h1.27 r90; Bottom Overlay "*" at 138.635,27.985 h1.27 r90; Bottom Overlay "RefDes" at 138.635,26.905 h1.27 r90
U6: Mechanical 13 "RefDes2" at 129.635,27.223 h1.27 r90; Mechanical 13 "*" at 129.635,26.486 h1.27 r90; Bottom Overlay "RefDes" at 129.635,26.905 h1.27 r90; Bottom Overlay "*" at 129.635,27.985 h1.27 r90; Bottom Overlay "REFDES" at 129.635,27.223 h1.27 r90